# Altium PCB Windmill_Circuit_v1.0.PcbDoc
Units mm, origin at the board's own origin, x right, y up, seen from the top; angles counter-clockwise.
Board outline 174.62 x 174.62 mm, 2 copper layers (Top Layer, Bottom Layer), stack 1.57 mm thick; 40 components, 27 nets, 108 pads, 0 vias.
Unrouted connection lines stored in the file: 78.
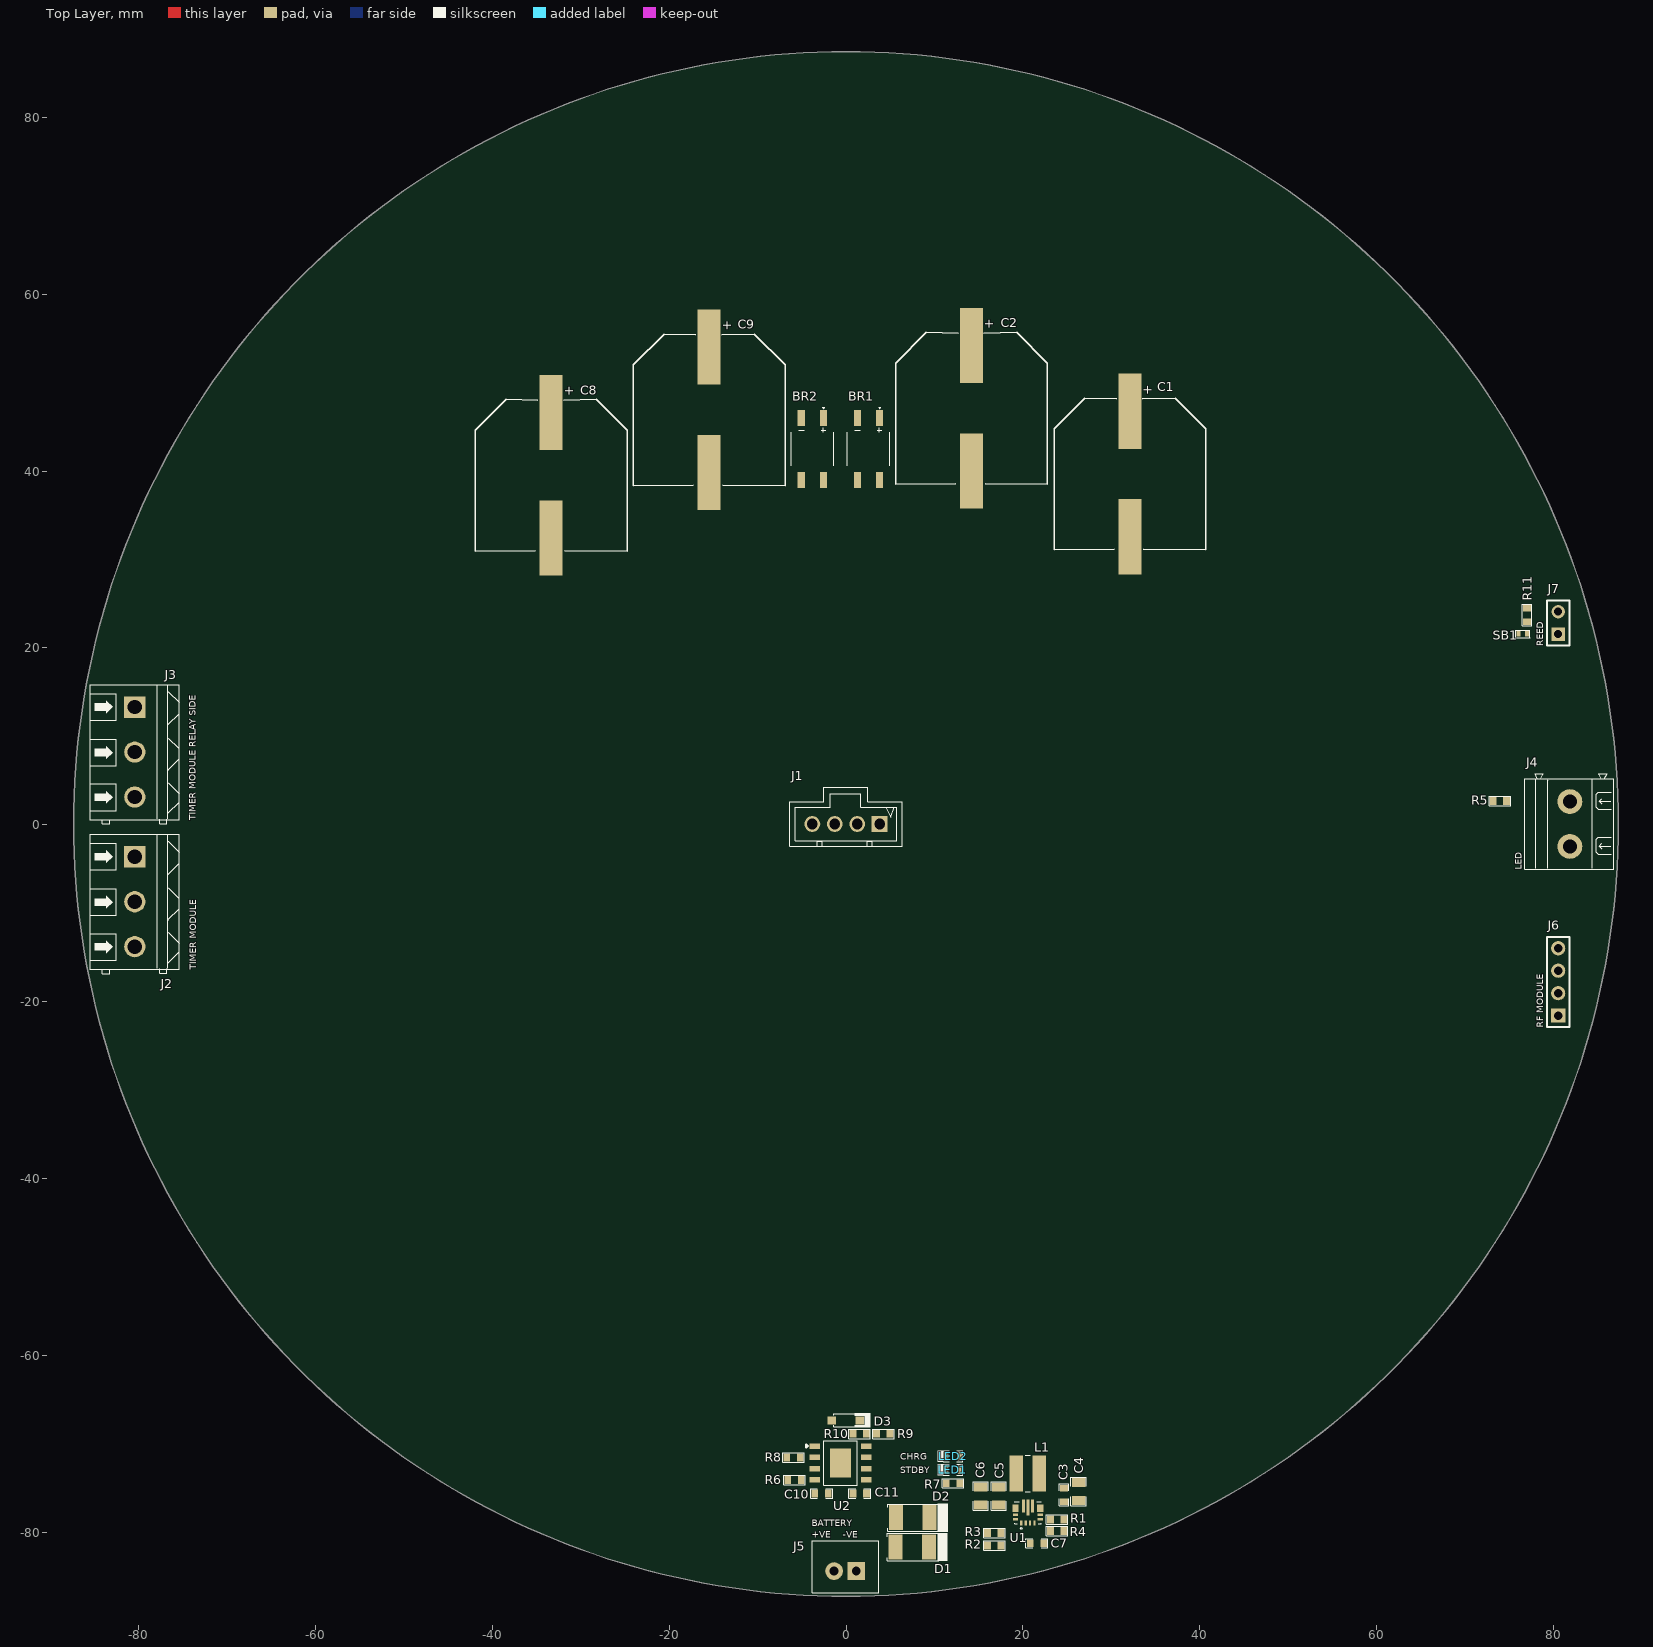
[diagram p0: Top Layer view]
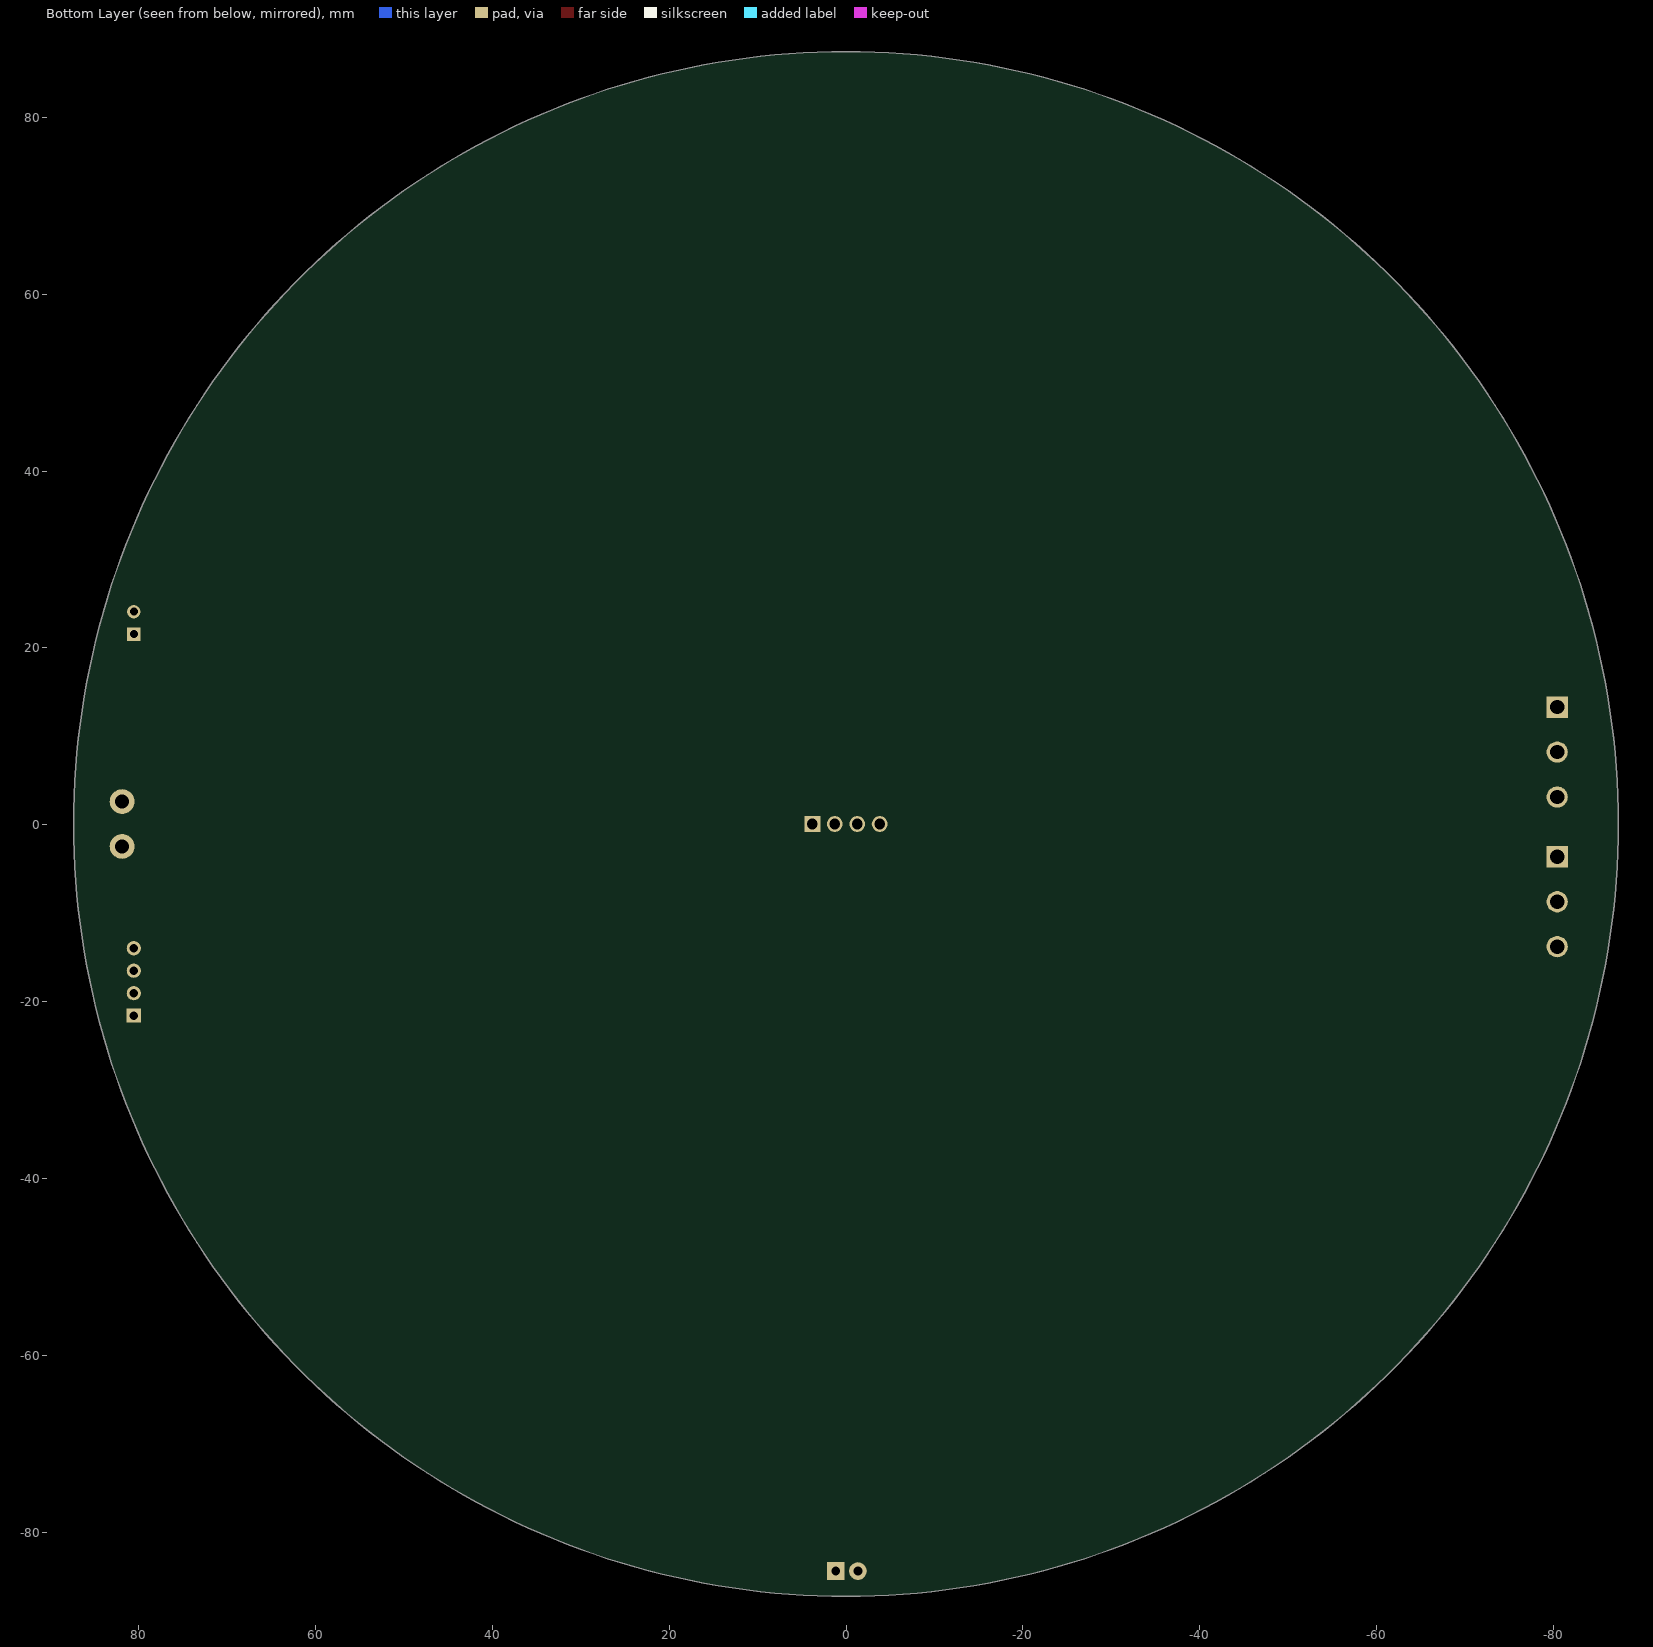
[diagram p1: Bottom Layer view, seen from below]

## Layer stack, top to bottom
Top Solder: solder mask 0.01, Solder Resist, Dk 3.5
Top Layer: signal copper 0.035
Dielectric 1: dielectric 1.5, FR-4, Dk 4.8
Bottom Layer: signal copper 0.035
Bottom Solder: solder mask 0.01, Solder Resist, Dk 3.5

## Board outline
-87.312,0.102 ccw(c0,0.102) 0,-87.211 ccw(c0,0.102) 87.312,0.102 ccw(c0,0.102) 0,87.414 ccw(c0,0.102)

## Design rules (kind name [scope] priority, off if disabled: settings)
Clearance [All] p1: gap=0.254 ignorepadtopadclearanceinfootprint=FALSE except(0: Arc-Hole Track-Hole SMDPad-Hole THPad-Hole Via-Hole Fill-Hole Poly-Hole Region-Hole Text-Hole)
PolygonConnect [All] p1: connectstyle=Relief reliefconductorwidth=0.254 reliefentries=4 polygonreliefangle="90 Angle" airgapwidth=0.254
RoutingVias [All] p1: holewidth=0.711 width=1.27 viastyle="Through Hole" minholewidth=0.711 minwidth=1.27 maxholewidth=0.711 maxwidth=1.27
SolderMaskExpansion [All] p1: expansion=0.102 istentingtop=FALSE
Width [All] p1: maxlimit=0.254 minlimit=0.254 preferedwidth=0.254
30 further rules are at their usual default settings.

## Components (designator, comment, footprint, x,y, rotation, side; value= is the part's Value field where it differs from the comment)
BR1 "MB26S" MB26S 2.54,42.494 r270 top
BR2 "MB26S" MB26S -3.81,42.494 r270 top
C1 "2200uF" VT1E222M1616 32.106,39.675 r270 top
C2 "2200uF" VT1E222M1616 14.199,47.098 r270 top
C3 "10uF" Cap-0603 24.638,-75.745 r270 top
C4 "47uF" Cap-0805 26.289,-75.364 r270 top
C5 "22uF" Cap-0805 17.272,-75.872 r270 top
C6 "22uF" Cap-0805 15.24,-75.872 r270 top
C7 "0.1uF" Cap-0603 21.59,-81.206 r180 top value=100nF
C8 "2200uF" VT1E222M1616 -33.325,39.522 r270 top
C9 "2200uF" VT1E222M1616 -15.469,46.921 r270 top
C10 "10uF" Cap-0603 -2.769,-75.567 r180 top
C11 "10uF" Cap-0603 1.549,-75.567 r0 top
D1 "SS26" SMA(DO-214AC) 7.493,-81.638 r180 top
D2 "SS26" SMA(DO-214AC) 7.544,-78.311 r180 top
D3 "MMSZ5231B-7-F" SOD-123 -0.026,-67.312 r0 top
J1 "X9556WV-04-N0V01" X9556WV-04-N0V01 0,0.102 r180 top locked
J2 "DB128L-5.08-3P-GN-S" DB128L-5.08-3P-GN-S -80.401,-3.607 r270 top
J3 "DB128L-5.08-3P-GN-S" DB128L-5.08-3P-GN-S -80.401,13.31 r270 top
J4 "DB128L-5.08-2P-GN-S" DB128L-5.08-2P-GN-S 81.837,0.102 r270 top
J5 "B2B-XH-A(LF)(SN)" B2B-XH-A(LF)(SN)_ -0.096,-84.356 r180 top
J6 "DNP" HDR1X4_ 80.516,-21.565 r90 top
J7 "X6511WV-02H-C60D30" HDR1X2_ 80.516,21.565 r90 top
L1 "1.5uH" FTC404020S1R5MGCA 20.544,-73.332 r0 top
LED1 "Emerald" LED-0603 12.09,-72.9 r180 top
LED2 "RED" LED-0603 12.102,-71.376 r180 top
R1 "523K" Res-0603 23.876,-78.539 r0 top value=523kR
R2 "100K" Res-0603 16.764,-81.46 r180 top value=100kR
R3 "10K" Res-0603 16.764,-80.063 r180 top
R4 "100K" Res-0603 23.876,-79.809 r0 top
R5 "0R" Res-0603 73.912,2.718 r180 top
R6 "0.47R" Res-0603 -5.817,-74.043 r0 top
R7 "1K" Res-0603 12.09,-74.424 r0 top
R8 "2K" Res-0603 -5.944,-71.503 r0 top
R9 "33K" Res-0603 4.216,-68.836 r180 top
R10 "10K" Res-0603 1.549,-68.836 r0 top
R11 "330R" Res-0603 76.986,23.724 r90 top
SB1 "Solder Bridge 0402" "Solder Bridge 0402" 76.516,21.59 r0 top
U1 "TPS63070RNMR" VQFN-15-HR(2.5x3) 20.562,-77.958 r90 top
U2 "TP4056" ESOP-8 -0.61,-72.138 r0 top

## Footprints (in the part's own frame and the unit in brackets; to place one, negate y for a bottom-side part, rotate by r counter-clockwise, add the part's x,y. Pads: shape width x height; smd on the part's side, far side on the other; paste and mask are expansions set on the pad)
B2B-XH-A(LF)(SN)_ [mm]
  rect 2x2 hole 1: 1(-1.25,0)
  round 2 hole 1: 2(1.25,0)
  silkscreen extent -3.78,-3.43 3.74,2.44, body extent -3.72,-3.37 3.68,2.38, height 7
Cap-0603 [mil]
  rect 30x35 smd mask+2.36: 1(-30,0) 2(30,0)
  silkscreen extent -49,-21 49,21, body extent -32,-16 31,16, height 34
Cap-0805 [mil] "SMD 0805"
  rect 40x60 smd mask+2.76: 1(-40,0) 2(40,0)
  silkscreen extent -64,-34 64,34, body extent -39,-25 39,25, height 30
DB128L-5.08-2P-GN-S [mm]
  round 2.8 hole 1.6: 1(-2.54,0) 2(2.54,0)
  silkscreen extent -5.7,-5.1 5.1,4.95, body extent -5.68,-5.12 5.08,4.88, height 14
DB128L-5.08-3P-GN-S [mm]
  rect 2.4x2.4 hole 1.6 paste+0 mask+0.051: 1(0,0)
  round 2.4 hole 1.6 paste+0 mask+0.051: 2(5.08,0) 3(10.16,0)
  silkscreen extent -2.54,-5.1 13.2,5, body extent -2.54,-5.1 13.2,5, height 14.1
ESOP-8 [mm]
  rect 1.2x0.6 smd: 1(-2.909,1.905) 2(-2.909,0.635) 3(-2.909,-0.635) 4(-2.909,-1.905) 5(2.909,-1.905) 6(2.909,-0.635) 7(2.909,0.635) 8(2.909,1.905)
  rect 2.4x3.3 smd: 9(0,0)
  silkscreen extent -3.88,-2.51 1.85,2.51, body extent -3,-2.45 3,2.45, height 1.75
FTC404020S1R5MGCA [mm]
  rect 1.5x4.1 smd: 1(-1.3,0) 2(1.3,0)
  silkscreen extent -0.29,-2.05 0.29,2.05
HDR1X2_ [mm] "CONN HEADER VERT 2POS 2.54MM"
  rect 1.5x1.5 hole 0.9: 1(0,0)
  round 1.5 hole 0.9: 2(2.54,0)
  silkscreen extent -1.27,-1.27 3.81,1.27, body extent -1.27,-1.27 3.81,1.27, height 8.44
HDR1X4_ [mm] "Connector; Header; 4 Position"
  rect 1.6x1.6 hole 0.95: 1(0,0)
  round 1.6 hole 0.95: 2(2.54,0) 3(5.08,0) 4(7.62,0)
  silkscreen extent -1.27,-1.27 8.89,1.27, body extent -1.27,-1.27 8.89,1.27, height 9.5
LED-0603 [mm]
  rect 0.5x1 smd: 1(-0.75,0) 2(0.75,0)
  silkscreen extent -1.12,-0.66 1.75,0.66, body extent -0.82,-0.37 0.82,0.36, height 0.68
MB26S [mm]
  rect 1.8x0.8 smd: 1(-3.5,1.25) 2(-3.5,-1.25) 3(3.5,-1.25) 4(3.5,1.25)
  silkscreen extent -4.69,-2.4 1.88,2.4, body extent -3.5,-2.35 3.5,2.35, height 2.65
Res-0603 [mil]
  rect 30x35 smd: 1(-30,0) 2(30,0)
  silkscreen extent -48,-21 48,21, body extent -31,-17 31,17, height 18
SMA(DO-214AC) [mm]
  rect 1.6x2.8 smd: 1(-1.9,0) 2(1.9,0)
  silkscreen extent -3.99,-1.6 2.84,1.6, body extent -2.6,-1.45 2.6,1.45, height 2.3
SOD-123 [mm]
  rect 0.95x0.9 smd: 1(-1.575,0) 2(1.575,0)
  silkscreen extent -1.37,-0.8 2.82,0.8, body extent -1.82,-0.78 1.83,0.78, height 1.5
"Solder Bridge 0402" [mil]
  rect 18x25 smd mask+2.17: 1(-18.5,0) 2(18.5,0)
  silkscreen extent -32,-17 32,16
VQFN-15-HR(2.5x3) [mm]
  rect 0.6x0.25 smd: 1(-0.962,0.75) 2(-0.962,0.25) 3(-0.962,-0.25) 4(-0.962,-0.75)
  rect 0.25x0.6 smd: 5(-0.537,-1.4) 6(-0.038,-1.4) 14(-0.038,1.4) 15(-0.537,1.4)
  rect 0.85x0.7 smd: 7_8(0.713,-1.4) 12_13(0.713,1.4)
  rect 1.45x0.35 smd: 9(0.962,-0.5) 11(0.962,0.5)
  rect 1.8x0.35 smd: 10(0.787,0)
  silkscreen extent -1.6,-1.5 1.44,1.5, body extent -1.05,-1.5 1.45,1.5, height 1
VT1E222M1616 [mm]
  rect 8.5x2.6 smd: 1(-7.093,0) 2(7.093,0)
  silkscreen extent -8.57,-8.58 8.58,8.58, body extent -9,-8.5 9,8.5, height 16.5
X9556WV-04-N0V01 [mm]
  rect 1.8x1.8 hole 1.2 paste+0 mask+0.051: 1(-3.81,0)
  round 1.8 hole 1.2 paste+0 mask+0.051: 2(-1.27,0) 3(1.27,0) 4(3.81,0)
  silkscreen extent -6.35,-4.15 6.35,2.54, body extent -6.35,-4.06 6.35,2.79, height 11.73

## Part data
BR1 BR2: "50A 700mV@2A 2A 60V MBS Bridge Rectifiers ROHS", LCSC Part Number=C840748, Manufacturer=MDD, Package=MBS, ComponentLink1Description=LCSC, ComponentLink1URL=https://www.lcsc.com/product-detail/Bridge-Rectifiers_MDD-Microdiode-Semiconductor-MB26S_C840748.html, Item Type="Bridge Rectifier", Manufacturer Part Number=MB26S
C1 C2 C8 C9: library part VT1E222M1616, "2200uF 25V 720mA@120Hz ±20% SMD,D16xL16.5mm Aluminum Electrolytic Capacitors - SMD ROHS", LCSC Part Number=C239249, Manufacturer=ROQANG, Package=SMD,D16xL16.5mm, ComponentLink1Description=LCSC, ComponentLink1URL=https://www.lcsc.com/product-detail/Aluminum-Electrolytic-Capacitors-SMD_ROQANG-VT1E222M1616_C239249.html, Item Type=Capacitor, Manufacturer Part Number=VT1E222M1616
C3 C10 C11: library part CC0603KRX5R7BB106, "CAP CER 10UF 16V X5R 0603", Case Code (Imperial)=0603, Case Code (Metric)=1608, LCSC Part Number=C2936601, Manufacturer=Yageo, Max Operating Temperature=85°C, Min Operating Temperature=-55°C, Supplier Part Number 1=311-3486-1-ND, Tolerance=10%, Voltage Rating=16V, Capacitance=10uF, Case/Package=0603, Category="Ceramic Capacitors", ComponentLink1Description=http://www.yageo.com/documents/recent/UPY-GPHC_X5R_4V-to-50V_25.pdf?src-supplier=Digi-Key, ComponentLink1URL=http://www.yageo.com/documents/recent/UPY-GPHC_X5R_4V-to-50V_25.pdf?src-supplier=Digi-Key, Item Type=Capacitor, Manufacturer Part Number=CC0603KRX5R7BB106, Mount="Surface Mount", Packaging="Cut Tape", Pricing 1="1=0.68000, 10=0.48000, 50=0.36300, 100=0.31610, 500=0.23416, 1000=0.19903 (USD)", RoHS=Yes, RoHS Compliant=Yes, Stock 1=240725, Supplier 1=Digi-Key
C4: library part GRM21BR61A476ME15L, "CAP CER 47UF 10V X5R 0805", Case Code (Imperial)=0805, Case Code (Metric)=2012, Dielectric=X5R, Dielectric Material=Ceramic, LCSC Part Number=C124129, Manufacturer=Murata, Max Operating Temperature=85°C, Min Operating Temperature=-55°C, Tolerance=20%, Voltage=10V, Case/Package=0805, ComponentLink1Description=http://www.farnell.com/datasheets/2079183.pdf?src-supplier=Farnell, ComponentLink1URL=http://www.farnell.com/datasheets/2079183.pdf?src-supplier=Farnell, ComponentLink2Description=http://www.farnell.com/datasheets/2079183.pdf?src-supplier=Newark, ComponentLink2URL=http://www.farnell.com/datasheets/2079183.pdf?src-supplier=Newark, ComponentLink3Description=http://www.farnell.com/datasheets/2079183.pdf?src-supplier=Element14, ComponentLink3URL=http://www.farnell.com/datasheets/2079183.pdf?src-supplier=Element14, ComponentLink4Description=https://datasheet.octopart.com/GRM21BR61A476ME15L-Murata-datasheet-66077109.pdf?src-supplier=Element14, ComponentLink4URL=https://datasheet.octopart.com/GRM21BR61A476ME15L-Murata-datasheet-66077109.pdf?src-supplier=Element14, ComponentLink5Description=http://search.murata.co.jp/Ceramy/image/img/A01X/G101/ENG/GRM21BR61A476ME15-01.pdf?src-supplier=Digikey, ComponentLink5URL=http://search.murata.co.jp/Ceramy/image/img/A01X/G101/ENG/GRM21BR61A476ME15-01.pdf?src-supplier=Digikey, ComponentLink6Description=https://search.murata.co.jp/Ceramy/image/img/A01X/G101/ENG/GRM21BR61A476ME15-01.pdf?src-supplier=Digikey, ComponentLink6URL=https://search.murata.co.jp/Ceramy/image/img/A01X/G101/ENG/GRM21BR61A476ME15-01.pdf?src-supplier=Digikey, ComponentLink7Description=http://psearch.en.murata.com/capacitor/product/GRM21BR61A476ME15%23.pdf?src-supplier=Avnet, ComponentLink7URL=http://psearch.en.murata.com/capacitor/product/GRM21BR61A476ME15%23.pdf?src-supplier=Avnet, Depth=1.25mm, Dissipation Factor=0.035%, Height=1.25mm, Item Type=Capacitors, Lead Free="Lead Free", Length=0.079inch, Manufacturer Part Number=GRM21BR61A476ME15L, Material=4241ConductorMaterial, Mounting Technology="Surface Mount", Packaging="Cut Tape", Pricing="3000=0.161, 6000=0.157, 9000=0.156, 12000=0.154, 15000=0.15 (USD)", Reach SVHC Compliant=No, RoHS=Yes, RoHS Compliant=Yes, Series=GRM, Stock=315000, Supplier="Future Electronics", Termination=SMD/SMT, Thickness=0.057inch, Voltage Rating=10V, Voltage Rating (DC)=10V, Width=0.049inch
C5 C6: library part CC0805MKX5R8BB226, "CAP CER 22UF 25V X5R 0805", Case Code (Imperial)=0805, Case Code (Metric)=2012, Dielectric=X5R, LCSC Part Number=C784585, Manufacturer=Yageo, Max Operating Temperature=85°C, Min Operating Temperature=-55°C, Package Quantity=3000, Supplier Part Number 1=311-1903-1-ND, Tolerance=20%, Voltage Rating=25V, Capacitance=22uF, Case/Package=0805, Category="Ceramic Capacitors", ComponentLink1Description=http://www.mouser.com/ds/2/447/Yageo_UPY-GP_NP0_16V-to-50V_9-358835.pdf?src-supplier=Mouser, ComponentLink1URL=http://www.mouser.com/ds/2/447/Yageo_UPY-GP_NP0_16V-to-50V_9-358835.pdf?src-supplier=Mouser, ComponentLink2Description=http://www.yageo.com/documents/recent/UPY-GPHC_X5R_4V-to-50V_25.pdf?src-supplier=Digi-Key, ComponentLink2URL=http://www.yageo.com/documents/recent/UPY-GPHC_X5R_4V-to-50V_25.pdf?src-supplier=Digi-Key, Halogen Free="Halogen Free", Height=1.25mm, Item Type=Capacitor, Lead Free="Lead Free", Length=0.079inch, Manufacturer Part Number=CC0805MKX5R8BB226, Mount="Surface Mount", Packaging="Tape and Reel", Pricing 1="1=0.47000, 10=0.33300, 50=0.25140, 100=0.21900, 500=0.16222, 1000=0.13789 (USD)", RoHS=Yes, RoHS Compliant=Yes, Stock 1=64970, Supplier 1=Digi-Key, Termination=SMD/SMT, Thickness=0.057inch, Voltage Rating (DC)=25V, Weight=0.000194oz, Width=0.049inch
C7: library part CC0603JRX7R8BB104, "CAP CER 0.1UF 25V X7R 0603", Case Code (Imperial)=0603, Case Code (Metric)=1608, Dielectric=X7R, LCSC Part Number=C327087, Manufacturer=Yageo, Max Operating Temperature=125°C, Min Operating Temperature=-55°C, Tolerance=5%, Voltage Rating=25V, Case/Package=0603, ComponentLink1Description=https://datasheet.ciiva.com/11465/upy-gphc-x7r-6-3v-to-50v-8-11465031.pdf?src-supplier=Avnet, ComponentLink1URL=https://datasheet.ciiva.com/11465/upy-gphc-x7r-6-3v-to-50v-8-11465031.pdf?src-supplier=Avnet, Construction=Flat, Halogen Free="Halogen Free", Height=0.8mm, Item Type=Capacitors, Lead Free="Lead Free", Length=1.6mm, Manufacturer Part Number=CC0603JRX7R8BB104, Mounting Technology="Surface Mount", Packaging="Tape and Reel", Pricing="1=0.1, 10=0.057, 50=0.039, 100=0.0335, 500=0.02436, 1000=0.0215 (USD)", RoHS=Yes, RoHS Compliant=Yes, Series=CC, Stock=448767, Supplier=Digikey, Termination=SMD/SMT, Thickness=0.035inch, Voltage Rating (DC)=25V, Weight=7.1E-05oz, Width=0.031inch
D1 D2: "60V 700mV@2A 2A SMA(DO-214AC) Schottky Barrier Diodes (SBD) ROHS", LCSC Part Number=C14238, Manufacturer=MDD, Package=SMA(DO-214AC), ComponentLink1Description=LCSC, ComponentLink1URL=https://www.lcsc.com/product-detail/Schottky-Barrier-Diodes-SBD_MDD-Microdiode-Electronics-SS26_C14238.html, Item Type=Diode, Manufacturer Part Number=SS26
D3: "DIODE ZENER 5.1V 500MW SOD123", LCSC Part Number=C85181, Manufacturer=Diodes, Supplier Part Number=5522370, Category="Zener Diodes", ComponentLink1Description=https://datasheet.ciiva.com/34302/1541116-34302407.pdf?src-supplier=Jameco, ComponentLink1URL=https://datasheet.ciiva.com/34302/1541116-34302407.pdf?src-supplier=Jameco, ComponentLink2Description=https://datasheet.ciiva.com/26912/getdatasheetpartid-141394-26912348.pdf?src-supplier=Verical, ComponentLink2URL=https://datasheet.ciiva.com/26912/getdatasheetpartid-141394-26912348.pdf?src-supplier=Verical, ComponentLink3Description=https://datasheet.ciiva.com/4734/ds18010-38133-4734216.pdf?src-supplier=Mouser, ComponentLink3URL=https://datasheet.ciiva.com/4734/ds18010-38133-4734216.pdf?src-supplier=Mouser, Item Type="Zener Diode", Manufacturer Part Number=MMSZ5231B-7-F, Pricing="3000=0.0138, 12000=0.0132, 45000=0.0127, 90000=0.0124, 225000=0.0118 (USD)", RoHS=Yes, Stock=273000, Supplier="Future Electronics"
J1: "1x4P 4P 1 Tin 2.54mm 4 3A Brass Direct Insert Plugin,P=2.54mm Wire To Board Connector ROHS", LCSC Part Number=C397403, Manufacturer="XKB Connection", Package=Plugin,P=2.54mm, ComponentLink1Description=LCSC, ComponentLink1URL=https://www.lcsc.com/product-detail/Wire-To-Board-Connector_XKB-Connection-X9556WV-04-N0V01_C397403.html?s_z=n_X9556WV-04-N0V01, Item Type="Wire to Board Connector", Manufacturer Part Number=X9556WV-04-N0V01
J2 J3: "1x3P 18A -40℃~+105℃ 250V Green 12~30 Direct Insert 5.08mm 2.5 1 3 Plugin,P=5.08mm Screw Terminal Blocks ROHS", LCSC Part Number=C395869, Manufacturer=DORABO, Package=Plugin,P=5.08mm, ComponentLink1Description=LCSC, ComponentLink1URL=https://www.lcsc.com/product-detail/Screw-Terminal-Blocks_DORABO-DB128L-5-08-3P-GN-S_C395869.html, Item Type="Terminal Block", Manufacturer Part Number=DB128L-5.08-3P-GN-S
J4: "1x2P 18A -40℃~+105℃ 250V Green 12~30 Straight 5.08mm 2.5 1 2 Plugin,P=5.08mm Screw terminal ROHS", LCSC Part Number=C395868, Manufacturer=DORABO, Package=Plugin,P=5.08mm, ComponentLink1Description=LCSC, ComponentLink1URL=https://www.lcsc.com/product-detail/Screw-terminal_DORABO-DB128L-5-08-2P-GN-S_C395868.html, Item Type="Terminal Block", Manufacturer Part Number=DB128L-5.08-2P-GN-S
J5: "Conn Shrouded Header (4 Sides) HDR 2 POS 2.5mm Solder ST Thru-Hole Box", Color=Natural, Contact Resistance=20mR, Current Rating=3A, Housing Color=White, Insulation Resistance=1GR, LCSC Part Number=C158012, Manufacturer=JST, Max Operating Temperature=85°C, Max Voltage Rating (AC)=250V, Min Operating Temperature=-25°C, Supplier Part Number 1=1516276, Category="FFC / FPC", ComponentLink1Description=https://datasheet.ciiva.com/26894/getdatasheetpartid-640357-26894434.pdf?src-supplier=Verical, ComponentLink1URL=https://datasheet.ciiva.com/26894/getdatasheetpartid-640357-26894434.pdf?src-supplier=Verical, ComponentLink2Description=https://datasheet.ciiva.com/11746/0900766b8082653e-11746979.pdf?src-supplier=RSComponents, ComponentLink2URL=https://datasheet.ciiva.com/11746/0900766b8082653e-11746979.pdf?src-supplier=RSComponents, ComponentLink3Description=https://datasheet.ciiva.com/26894/getdatasheetpartid-385291-26894760.pdf?src-supplier=Verical, ComponentLink3URL=https://datasheet.ciiva.com/26894/getdatasheetpartid-385291-26894760.pdf?src-supplier=Verical, ComponentLink4Description=https://datasheet.ciiva.com/8052/5448-8052024.pdf?src-supplier=Element14, ComponentLink4URL=https://datasheet.ciiva.com/8052/5448-8052024.pdf?src-supplier=Element14, ComponentLink5Description=https://datasheet.ciiva.com/20207/523653-20207167.pdf?src-supplier=Rapid+Electronics, ComponentLink5URL=https://datasheet.ciiva.com/20207/523653-20207167.pdf?src-supplier=Rapid+Electronics, Connector Type="Male Pin", Contact Material=Brass, Contact Plating=Tin,Copper,Lead, Depth=5.75mm, Fastening Type=Detent, Housing Material=Polyamide, Item Type="JST Connector", Lead Free="Lead Free", Lead Pitch=2.5mm, Length=7.4mm, Manufacturer Part Number=B2B-XH-A(LF)(SN), Max Current Rating=3A, Max Voltage Rating (DC)=250V, Mount="Through Hole", Number of Contacts=2, Number of Positions=2, Number of Rows=1, Orientation=Straight, Packaging=Bulk, Pitch=2.5mm, Pricing 1="100=0.06860, 1000=0.04800, 2500=0.04520, 5000=0.04230, 10000=0.03950, 20000=0.03660 (GBP)", REACH SVHC="No SVHC", RoHS=Yes, Stock 1=219240, Supplier 1=Farnell, Termination=Solder, Voltage Rating=250V, Voltage Rating (AC)=250V, Wire/Cable Gauge=22AWG
J6: library part X6511WV-04H-C60D30, "Gold 250V 3A Straight Square Pins 2.5mm 4P 260℃ 6mm -40℃~+105℃ 3mm 2.54mm Plugin Black Brass 1x4P Plugin,P=2.54mm Pin Headers ROHS", LCSC Part Number=C706876, Manufacturer=XKB, Package=Plugin,P=2.54mm, ComponentLink1Description=LCSC, ComponentLink1URL=https://www.lcsc.com/product-detail/Pin-Headers_XKB-Connectivity-X6511WV-04H-C60D30_C706876.html, Item Type="Male Header", Manufacturer Part Number=X6511WV-04H-C60D30
J7: "Gold 250V 3A Straight Square Pins 2.5mm 2P 260℃ 6mm -40℃~+105℃ 3mm 2.54mm Plugin Black Brass 1x2P Plugin,P=2.54mm Pin Headers ROHS", LCSC Part Number=C706874, Manufacturer=XKB, Package=Plugin,P=2.54mm, ComponentLink1Description=LCSC, ComponentLink1URL=https://www.lcsc.com/product-detail/Pin-Headers_XKB-Connectivity-X6511WV-02H-C60D30_C706874.html, Item Type="Male Header", Manufacturer Part Number=X6511WV-02H-C60D30
L1: library part FTC404020S1R5MGCA, "6A 1.5uH ±20% 10.5A SMD,4.1x4.1mm Power Inductors ROHS", LCSC Part Number=C39676069, Manufacturer="cjiang (Changjiang Microelectronics Tech)", Package=SMD,4.1x4.1mm, ComponentLink1Description=LCSC, ComponentLink1URL=https://www.lcsc.com/product-detail/Power-Inductors_cjiang-Changjiang-Microelectronics-Tech-FTC404020S1R5MGCA_C39676069.html, Item Type=Inductor, Manufacturer Part Number=FTC404020S1R5MGCA
LED1: library part NCD0603G2, "Emerald 0603 Light Emitting Diodes (LED) ROHS", LCSC Part Number=C87326, Manufacturer="Foshan NationStar Optoelectronics", Package=0603, ComponentLink1Description=LCSC, ComponentLink1URL=https://www.lcsc.com/product-detail/Light-Emitting-Diodes-LED_Foshan-NationStar-Optoelectronics-NCD0603G2_C87326.html, Item Type=LED, Manufacturer Part Number=NCD0603G2
LED2: library part NCD0603R3, "RED LED 0603 Light Emitting Diodes", LCSC Part Number=C3151730, Manufacturer="Foshan NationStar Optoelectronics", Package=0603, ComponentLink1Description=LCSC, ComponentLink1URL=https://www.lcsc.com/product-detail/Light-Emitting-Diodes-LED_Foshan-NationStar-Optoelectronics-NCD0603R3_C3151730.html, Item Type=LED, Manufacturer Part Number=NCD0603R3
R1: library part RT0603BRD07523KL, "RES SMD 523K OHM 0.1% 1/10W 0603", Case Code (Imperial)=0603, Case Code (Metric)=1608, LCSC Part Number=C861460, Manufacturer=Yageo, Max Operating Temperature=155°C, Max Power Dissipation=100mW, Min Operating Temperature=-55°C, Supplier Part Number=13-RT0603BRD07523KLCT-ND, Temperature Coefficient=25ppm/°C, Tolerance=0.1%, Voltage Rating=75V, Case/Package=0603, ComponentLink1Description=https://datasheet.ciiva.com/12812/pyu-rt-1-to-0-05-rohs-l-4-12812552.pdf?src-supplier=Mouser, ComponentLink1URL=https://datasheet.ciiva.com/12812/pyu-rt-1-to-0-05-rohs-l-4-12812552.pdf?src-supplier=Mouser, Features="Moisture Resistant", Height=0.022inch, Item Type=Resistor, Length=0.063inch, Manufacturer Part Number=RT0603BRD07523KL, Number of Terminations=2, Packaging="Tape and Reel", Power Rating=100mW, Pricing="1=0.13, 10=0.102, 50=0.081, 100=0.0728, 500=0.0558, 1000=0.04943 (USD)", RoHS=Yes, RoHS Compliant=Yes, Series=RT, Supplier=Digikey, Termination=SMD/SMT, Weight=7.1E-05oz, Width=0.8mm
R2: library part RC0603FR-07100KL, "RES 100K OHM 1% 1/10W 0603", Case Code (Imperial)=0603, Case Code (Metric)=1608, LCSC Part Number=C14675, Manufacturer=Yageo, Max Operating Temperature=155°C, Max Power Dissipation=100mW, Min Operating Temperature=-55°C, Package Quantity=5000, Resistance Tolerance=1%, Resistor Type="Thick Film", Supplier Part Number=2424020, Temperature Coefficient=100ppm/°C, Voltage Rating=50V, Case/Package=0603, Category="Chip SMD Resistors", ComponentLink1Description=https://datasheet.ciiva.com/11819/0900766b80f96399-11819227.pdf?src-supplier=Rs, ComponentLink1URL=https://datasheet.ciiva.com/11819/0900766b80f96399-11819227.pdf?src-supplier=Rs, ComponentLink2Description=https://datasheet.ciiva.com/2455/pyu-r-int-thick-7-2455183.pdf?src-supplier=Digikey, ComponentLink2URL=https://datasheet.ciiva.com/2455/pyu-r-int-thick-7-2455183.pdf?src-supplier=Digikey, ComponentLink3Description=https://datasheet.ciiva.com/2455/pyu-r-int-thick-7-2455184.pdf?src-supplier=Digikey, ComponentLink3URL=https://datasheet.ciiva.com/2455/pyu-r-int-thick-7-2455184.pdf?src-supplier=Digikey, ComponentLink4Description=https://datasheet.ciiva.com/2455/pyu-r-int-thick-7-2455182.pdf?src-supplier=Digikey, ComponentLink4URL=https://datasheet.ciiva.com/2455/pyu-r-int-thick-7-2455182.pdf?src-supplier=Digikey, Construction=Rectangular, Depth=0.8mm, Features="Moisture Resistant", Height=0.45mm, Item Type=Resistors, Lead Free=5697LeadFree, Length=1.6mm, Manufacturer Part Number=RC0603FR-07100KL, Military Standard=Not, Mounting Technology="Surface Mount", Number of Terminations=2, Packaging="Tape and Reel", Pins=2, Power Rating=100mW, Reach SVHC Compliant=No, RoHS=Yes, RoHS Compliant=Yes, Series=RC, Stock=27300, Supplier=Rs, Technology="THICK FILM", Termination=SMD/SMT, Tolerance=1%, Voltage Rating (DC)=50V, Weight=7.1E-05oz, Width=0.8mm
R3 R10: library part RC0603FR-0710KL, "RES SMD 10K Ohm 1% 1/10W 0603", Case Code (Imperial)=0603, Case Code (Metric)=1608, LCSC Part Number=C98220, Manufacturer=Yageo, Max Operating Temperature=155°C, Max Power Dissipation=100mW, Min Operating Temperature=-55°C, Resistance=10kR, Resistance Tolerance=1%, Resistor Type="Thick Film", Supplier Part Number 1=311-10.0KHRCT-ND, Temperature Coefficient=100ppm/°C, Voltage Rating=75V, Voltage Rating (DC)=50V, Case/Package=0603, Category="Chip SMD Resistors", ComponentLink1Description=https://datasheet.ciiva.com/7660/38590-7660789.pdf?src-supplier=Element14, ComponentLink1URL=https://datasheet.ciiva.com/7660/38590-7660789.pdf?src-supplier=Element14, ComponentLink2Description=https://datasheet.ciiva.com/7983/443971-7983596.pdf?src-supplier=Element14, ComponentLink2URL=https://datasheet.ciiva.com/7983/443971-7983596.pdf?src-supplier=Element14, ComponentLink3Description=https://datasheet.ciiva.com/22747/443971-22747519.pdf?src-supplier=Element14, ComponentLink3URL=https://datasheet.ciiva.com/22747/443971-22747519.pdf?src-supplier=Element14, ComponentLink4Description=https://datasheet.ciiva.com/46440/1868787-46440891.pdf?src-supplier=Element14, ComponentLink4URL=https://datasheet.ciiva.com/46440/1868787-46440891.pdf?src-supplier=Element14, ComponentLink5Description=https://datasheet.ciiva.com/7746/1738695-7746239.pdf?src-supplier=Element14, ComponentLink5URL=https://datasheet.ciiva.com/7746/1738695-7746239.pdf?src-supplier=Element14, ComponentLink6Description=https://datasheet.ciiva.com/15189/getdatasheetpartid-409289-15189591.pdf?src-supplier=Verical, ComponentLink6URL=https://datasheet.ciiva.com/15189/getdatasheetpartid-409289-15189591.pdf?src-supplier=Verical, Construction=Rectangular, Depth=0.8mm, Features="Moisture Resistant", Height=0.45mm, Item Type=Resistor, Lead Free="Lead Free", Lead Pitch=0.3mm, Length=1.6mm, Manufacturer Part Number=RC0603FR-0710KL, Military Standard=Not, Number of Pins=2, Number of Terminations=2, Packaging="Tape and Reel", Power Rating=100mW, Pricing 1="1=0.10000, 10=0.02400, 100=0.00970, 1000=0.00436, 2500=0.00378 (USD)", REACH SVHC=Unknown, RoHS=Yes, RoHS Compliant=Yes, Series=RC, Size Code=0603, Stock 1=25249139, Supplier 1=Digi-Key, Termination=SMD/SMT, Tolerance=1%, Weight=7.1E-05oz, Width=0.8mm
R4: library part RT0603BRD07100KL, "RES SMD 100K OHM 0.1% 1/10W 0603", Case Code (Imperial)=0603, Case Code (Metric)=1608, LCSC Part Number=C122538, Manufacturer=Yageo, Max Operating Temperature=125°C, Max Power Dissipation=100mW, Min Operating Temperature=-55°C, Package Quantity=5000, Resistance=100kR, Supplier Part Number 1=YAG1235CT-ND, Temperature Coefficient=25ppm/°C, Tolerance=0.1%, Voltage Rating=75V, Case/Package=0603, ComponentLink1Description=http://documents.rs-components.com/techlib://itc_doclist_GB.htm?stockno=6174810&src-supplier=RSComponents, ComponentLink1URL=http://documents.rs-components.com/techlib://itc_doclist_GB.htm?stockno=6174810&src-supplier=RSComponents, Composition="Thin Film", Depth=0.8mm, Features="Moisture Resistant", Height=0.022inch, Item Type=Resistor, Lead Free="Lead Free", Length=1.6mm, Manufacturer Part Number=RT0603BRD07100KL, Military Standard=Not, Mount="Surface Mount", Number of Terminations=2, Packaging="Tape and Reel", Power Rating=100mW, Pricing 1="1=0.39, 10=0.332, 100=0.1298, 1000=0.05435, 2500=0.04982 (USD)", Stock 1=53395, Supplier 1=Digi-Key, Termination=SMD/SMT, Voltage Rating (DC)=75V, Width=0.031inch, Working Voltage=75V
R5: library part RC0603JR-070RL, "RES 0 OHM JUMPER 1/10W 0603", Case Code (Imperial)=0603, Case Code (Metric)=1608, LCSC Part Number=C95177, Manufacturer=Yageo, Max Operating Temperature=155°C, Max Power Dissipation=100mW, Min Operating Temperature=-55°C, Package Quantity=5000, Resistance=0mR, Resistance Tolerance=5%, Resistor Type="Thick Film", Supplier Part Number 1=311-0.0GRCT-ND, Temperature Coefficient=200ppm/°C, Tolerance=1%, Voltage Rating=50V, Case/Package=0603, Category="Chip SMD Resistors", Construction=Rectangular, Contact Plating=Tin,Matte, Depth=0.8mm, Features="Moisture Resistant", Height=0.45mm, Item Type=Resistor, Lead Free="Lead Free", Length=1.6mm, Manufacturer Part Number=RC0603JR-070RL, Military Standard=Not, Number of Pins=2, Number of Terminations=2, Packaging="Tape and Reel", Power Rating=100mW, Pricing 1="1=0.10000, 10=0.01700, 25=0.01240, 50=0.00960, 100=0.00700, 250=0.00536, 500=0.00430, 1000=0.00316 (USD)", Radiation Hardening=No, Reach SVHC Compliant="No SVHC", RoHS=Yes, RoHS Compliant=Yes, Series=RC, Size Code=0603, Stock 1=18081776, Supplier 1=Digi-Key, Technology="THICK FILM", Termination=SMD/SMT, Voltage Rating (DC)=50V, Width=0.8mm
R6: library part RL0603JR-070R47L, "RES 0.47 OHM 5% 1/10W 0603", LCSC Part Number=C705484, Manufacturer=Yageo, ComponentLink1Description=https://datasheet.ciiva.com/14983/pyu-rl-group-521-rohs-l-0-14983432.pdf?src-supplier=Digikey, ComponentLink1URL=https://datasheet.ciiva.com/14983/pyu-rl-group-521-rohs-l-0-14983432.pdf?src-supplier=Digikey, ComponentLink2Description=https://datasheet.ciiva.com/17055/pyu-rl-521-rohs-l-5-17055645.pdf?src-supplier=Future+Electronics, ComponentLink2URL=https://datasheet.ciiva.com/17055/pyu-rl-521-rohs-l-5-17055645.pdf?src-supplier=Future+Electronics, Item Type=Resistor, Manufacturer Part Number=RL0603JR-070R47L, Pricing="1=0.13, 10=0.044, 50=0.0392, 100=0.0347, 500=0.03264, 1000=0.02958 (USD)", RoHS=Yes, Stock=1845, Supplier=Digikey
R7: library part RC0603FR-071KL, "RES SMD 1K OHM 1% 1/10W 0603", Case Code (Imperial)=0603, Case Code (Metric)=1608, LCSC Part Number=C22548, Manufacturer=Yageo, Max Operating Temperature=155°C, Min Operating Temperature=-55°C, Power Rating=100mW, Resistance=1kR, Supplier Part Number 1=311-1.00KHRDKR-ND, Temperature Coefficient=100ppm/°C, Tolerance=1%, Voltage Rating=50V, Case/Package=0603, ComponentLink1Description=https://www.verical.com/server-webapp/html/getDatasheet?partID=409289&src-supplier=Verical, ComponentLink1URL=https://www.verical.com/server-webapp/html/getDatasheet?partID=409289&src-supplier=Verical, ComponentLink2Description=http://documents.rs-components.com/techlib://itc_doclist_GB.htm?stockno=5048928&src-supplier=RSComponents, ComponentLink2URL=http://documents.rs-components.com/techlib://itc_doclist_GB.htm?stockno=5048928&src-supplier=RSComponents, ComponentLink3Description=http://www.yageo.com/documents/recent/PYu-RC0603_51_RoHS_L_4.pdf?src-supplier=Avnet+Europe, ComponentLink3URL=http://www.yageo.com/documents/recent/PYu-RC0603_51_RoHS_L_4.pdf?src-supplier=Avnet+Europe, ComponentLink4Description=http://www.farnell.com/datasheets/2167052.pdf?src-supplier=Element14, ComponentLink4URL=http://www.farnell.com/datasheets/2167052.pdf?src-supplier=Element14, ComponentLink5Description=http://www.farnell.com/datasheets/1868787.pdf?src-supplier=Element14, ComponentLink5URL=http://www.farnell.com/datasheets/1868787.pdf?src-supplier=Element14, ComponentLink6Description=http://www.yageo.com/documents/recent/PYu-RC_Group_51_RoHS_L_2.pdf?src-supplier=Avnet, ComponentLink6URL=http://www.yageo.com/documents/recent/PYu-RC_Group_51_RoHS_L_2.pdf?src-supplier=Avnet, ComponentLink7Description=https://www.verical.com/server-webapp/html/getDatasheet?partID=404327&src-supplier=Verical, ComponentLink7URL=https://www.verical.com/server-webapp/html/getDatasheet?partID=404327&src-supplier=Verical, ComponentLink8Description=http://www.farnell.com/datasheets/443971.pdf?src-supplier=Element14, ComponentLink8URL=http://www.farnell.com/datasheets/443971.pdf?src-supplier=Element14, Composition="Thick Film", Contact Plating=Tin,Matte, Depth=0.8mm, Height=0.45mm, Item Type=Resistor, Lead Free="Lead Free", Length=1.6mm, Manufacturer Part Number=RC0603FR-071KL, Military Standard=Not, Packaging="Tape and Reel", Pricing 1="1=0.1, 10=0.023, 100=0.0094, 1000=0.0042, 2500=0.0037 (USD)", Radiation Hardening=No, REACH SVHC="No SVHC", Stock 1=21472395, Supplier 1=Digi-Key, Termination=SMD/SMT
R8: library part RC0603FR-072KL, "RES SMD 2K OHM 1% 1/10W 0603", Case Code (Imperial)=0603, Case Code (Metric)=1608, LCSC Part Number=C105576, Manufacturer=Yageo, Max Operating Temperature=155°C, Max Power Dissipation=100mW, Min Operating Temperature=-55°C, Package Quantity=1, Resistance=2kR, Supplier Part Number 1=311-2.00KHRCT-ND, Temperature Coefficient=100ppm/°C, Tolerance=1%, Voltage Rating=50V, Working Voltage=75V, Case/Package=0603, ComponentLink1Description=http://www.farnell.com/datasheets/2167052.pdf?src-supplier=Element14, ComponentLink1URL=http://www.farnell.com/datasheets/2167052.pdf?src-supplier=Element14, ComponentLink2Description=http://documents.rs-components.com/techlib://itc_doclist_GB.htm?stockno=5050139&src-supplier=RSComponents, ComponentLink2URL=http://documents.rs-components.com/techlib://itc_doclist_GB.htm?stockno=5050139&src-supplier=RSComponents, ComponentLink3Description=http://www.yageo.com/documents/recent/PYu-RC_Group_51_RoHS_L_10.pdf?src-supplier=Digi-Key, ComponentLink3URL=http://www.yageo.com/documents/recent/PYu-RC_Group_51_RoHS_L_10.pdf?src-supplier=Digi-Key, ComponentLink4Description=http://www.mouser.com/catalog/specsheets/RC0603.pdf?src-supplier=Mouser, ComponentLink4URL=http://www.mouser.com/catalog/specsheets/RC0603.pdf?src-supplier=Mouser, Composition="Thick Film", Depth=0.8mm, Features="Moisture Resistant", Height=0.45mm, Lead Free="Lead Free", Length=1.6mm, Manufacturer Part Number=RC0603FR-072KL, Military Standard=Not, Number of Pins=2, Number of Terminations=2, Packaging="Tape and Reel", Power Rating=100mW, Pricing 1="1=0.1, 10=0.023, 100=0.0094, 1000=0.00421, 2500=0.00366 (USD)", REACH SVHC="No SVHC", Stock 1=8782961, Supplier 1=Digi-Key, Termination=SMD/SMT, Voltage Rating (DC)=50V, Width=0.031inch
R9: library part RT0603BRD0733KL, "RES SMD 33K OHM 0.1% 1/10W 0603", Case Code (Imperial)=0603, Case Code (Metric)=1608, LCSC Part Number=C705768, Manufacturer=Yageo, Max Operating Temperature=125°C, Max Power Dissipation=100mW, Min Operating Temperature=-55°C, Package Quantity=5000, Resistance=33kR, Resistor Type="Thin Film", Temperature Coefficient=25ppm/°C, Voltage Rating=75V, Voltage Rating (DC)=50V, Case/Package=0603, Category="Chip SMD Resistors", ComponentLink1Description=https://datasheet.ciiva.com/2585/pyu-rt-1-to-0-05-rohs-l-4-2585891.pdf?src-supplier=Digi-Key, ComponentLink1URL=https://datasheet.ciiva.com/2585/pyu-rt-1-to-0-05-rohs-l-4-2585891.pdf?src-supplier=Digi-Key, ComponentLink2Description=https://datasheet.ciiva.com/12810/pyu-rt-1-to-0-05-rohs-l-4-12810117.pdf?src-supplier=Mouser, ComponentLink2URL=https://datasheet.ciiva.com/12810/pyu-rt-1-to-0-05-rohs-l-4-12810117.pdf?src-supplier=Mouser, ComponentLink3Description=https://datasheet.ciiva.com/8889/pyu-rt-1-to-0-05-rohs-l-4-8889590.pdf?src-supplier=Avnet, ComponentLink3URL=https://datasheet.ciiva.com/8889/pyu-rt-1-to-0-05-rohs-l-4-8889590.pdf?src-supplier=Avnet, Construction=Rectangular, Contact Plating=Tin,Matte, Depth=0.8mm, Features="Moisture Resistant", Height=0.022inch, Lead Free="Lead Free", Length=1.6mm, Manufacturer Part Number=RT0603BRD0733KL, Military Standard=Not, Number of Terminations=2, Packaging="Tape and Reel", Power Rating=100mW, Pricing 1="1=0.30860 (USD)", Radiation Hardening=No, RoHS=Yes, RoHS Compliant=Yes, Series=RT, Size Code=0603, Stock 1=2, Supplier 1="Arrow Electronics", Supplier Part Number 1=RT0603BRD0733KL, Termination=SMD/SMT, Weight=7.1E-05oz, Width=0.031inch
R11: library part RC0603JR-07330RL, "RES  SMD 330R 100 mW 0603", Case Code (Imperial)=0603, Case Code (Metric)=1608, LCSC Part Number=C105879, Manufacturer=Yageo, Max Operating Temperature=155°C, Max Power Dissipation=100mW, Min Operating Temperature=-55°C, Package Quantity=5000, Resistance Tolerance=5%, Resistor Type="Thick Film", Supplier Part Number 1=311-330GRCT-ND, Temperature Coefficient=100ppm/°C, Voltage Rating=50V, Case/Package=0603, Category="Chip SMD Resistors", Construction=Rectangular, Depth=0.8mm, Features="Moisture Resistant", Height=0.45mm, Item Type=Resistor, Lead Free="Lead Free", Length=1.6mm, Manufacturer Part Number=RC0603JR-07330RL, Military Standard=Not, Number of Pins=2, Number of Terminations=2, Packaging="Tape and Reel", Power Rating=100mW, Pricing 1="1=0.10000, 10=0.02000, 100=0.00800, 1000=0.00360, 2500=0.00312 (USD)", REACH SVHC="No SVHC", Resistance=330R, RoHS=Yes, RoHS Compliant=Yes, Series=RC, Size Code=0603, Stock 1=1074593, Supplier 1=Digi-Key, Termination=SMD/SMT, Tolerance=5%, Voltage Rating (DC)=50V, Width=0.8mm
SB1: "Solder Bridge ON", Item Type="Solder Bridge", Manufacturer Part Number="Solder Bridge 0402"
U1: "IC REG BCK BST ADJ 3.6A 15VQFN", LCSC Part Number=C109322, Manufacturer="Texas Instruments", Supplier Part Number=595-TPS63070RNMR, Category="Voltage Regulators - Switching", ComponentLink1Description=http://www.ti.com/lit/ds/symlink/tps63070.pdf?src-supplier=Digi-Key, ComponentLink1URL=http://www.ti.com/lit/ds/symlink/tps63070.pdf?src-supplier=Digi-Key, ComponentLink2Description=http://www.ti.com/lit/ds/symlink/tps63070.pdf?src-supplier=Farnell, ComponentLink2URL=http://www.ti.com/lit/ds/symlink/tps63070.pdf?src-supplier=Farnell, Item Type=IC, Manufacturer Part Number=TPS63070RNMR, Pricing="1=2.7, 10=2.29, 50=2.29, 100=1.99, 1000=1.43, 10000=1.21 (USD)", RoHS=Yes, Stock=55982, Supplier=Mouser
U2: "3.7V~6.5V Lithium-ion 1 1000mA ESOP-8 Battery Management ROHS", LCSC Part Number=C725790, Manufacturer="UMW(Youtai Semiconductor Co., Ltd.)", Package=ESOP-8, ComponentLink1Description=LCSC, ComponentLink1URL=https://www.lcsc.com/product-detail/Battery-Management_UMW-Youtai-Semiconductor-Co-Ltd-TP4056_C725790.html?s_z=n_TP4056, Item Type=IC, Manufacturer Part Number=TP4056

## Nets (pads, with @x,y where several pads share a name; then routed paths per layer and width w, separated by ;. In a path a pad name is that pad's centre, name@x,y a point inside that pad or via, vN(x,y) a via of type N, cw(c..) or ccw(c..) an arc to the next point about the centre after c; other vN are vias at no path point)
5V: C3.2 C4.2 J2.1 J6.2 R1.2 R2.2 R6.1 R11.2 U1.7_8
12V: BR1.1 BR2.1 C1.1 C2.1 C8.1 C9.1 D1.2 R9.1
12V#: C5.2 C6.2 D1.1 D2.1 R3.1 U1.1 U1.12_13
BAT+: C11.2 D2.2 J5.2 U2.5
GND: BR1.2 BR2.2 C1.2 C2.2 C3.1 C4.1 C5.1 C6.1 C7.1 C8.2 C9.2 C10.1 C11.1 D3.1 J2.3 J5.1 J6.1 R4.1 R8.1 R10.1 SB1.1 U1.4 U1.6 U1.10 U1.15 U2.1 U2.3 U2.9
NetBR1_3: BR1.3 J1.2
NetBR1_4: BR1.4 J1.1
NetBR2_3: BR2.3 J1.4
NetBR2_4: BR2.4 J1.3
NetC7_2: C7.2 U1.3
NetC10_2: C10.2 R6.2 R7.1 U2.4
NetD3_2: D3.2 R9.2 R10.2 U2.8
NetJ4_1: J4.1 R5.1
NetJ7_1: J7.1 R11.1 SB1.2
NetL1_1: L1.1 U1.11
NetL1_2: L1.2 U1.9
NetLED1_1: LED1.1 LED2.1 R7.2
NetLED1_2: LED1.2 U2.6
NetLED2_2: LED2.2 U2.7
NetR1_1: R1.1 R4.2 U1.5
NetR2_1: R2.1 U1.2
NetR3_2: R3.2 U1.14
NetR8_2: R8.2 U2.2
OUT+: J6.3 R5.2
OUT-: J3.2 J6.4
REED_SW: J2.2 J7.2
RLY_NO: J3.3 J4.2
pads on no net: J3.1

## Silkscreen, mask and mechanical layers (free items; w line width, h text height)
Top Overlay:
  text "REED" at 79.114,20.223 h1.27 r90
  text "TIMER MODULE RELAY SIDE" at -73.203,0.51 h1.27 r90
  text "LED" at 76.676,-5.062 h1.27 r90
  text "TIMER MODULE" at -73.162,-16.353 h1.27 r90
  text "RF MODULE" at 79.114,-22.932 h1.27 r90
  text "CHRG" at 6.149,-72.079 h1.27
  text "STDBY" at 6.149,-73.586 h1.27
  text "BATTERY" at -3.899,-79.581 h1.27
  text "+VE" at -3.899,-80.846 h1.27
  text "-VE" at -0.37,-80.846 h1.27
Dimension:
  circle w0.254: c0,0.102 r36.512
Board_Outline:
  circle w0.254: c0,0.102 r87.312

## Dimensions
36.512,0.102 to 87.312,0.102 on Dimension
-87.312,0.102 to 87.312,0.102 on Dimension
-36.512,0.102 to 36.512,0.102 on Dimension

## Text inside footprints (layer, text, board x,y; h text height)
C1: Top Overlay "+" at 33.676,49.779 h1.02 r270
C2: Top Overlay "+" at 15.769,57.203 h1.02 r270
C8: Top Overlay "+" at -31.754,49.627 h1.02 r270
C9: Top Overlay "+" at -13.898,57.025 h1.02 r270